# Altium PCB Copy of TQ210_BOARD_V4-20121031.PcbDoc (part 4 of 8)
Units mm, origin at the board's own origin, x right, y up, seen from the top; angles counter-clockwise.
Board outline 191.2 x 131.27 mm, 2 copper layers (TopLayer, BottomLayer); 362 components, 455 nets, 1594 pads, 630 vias.
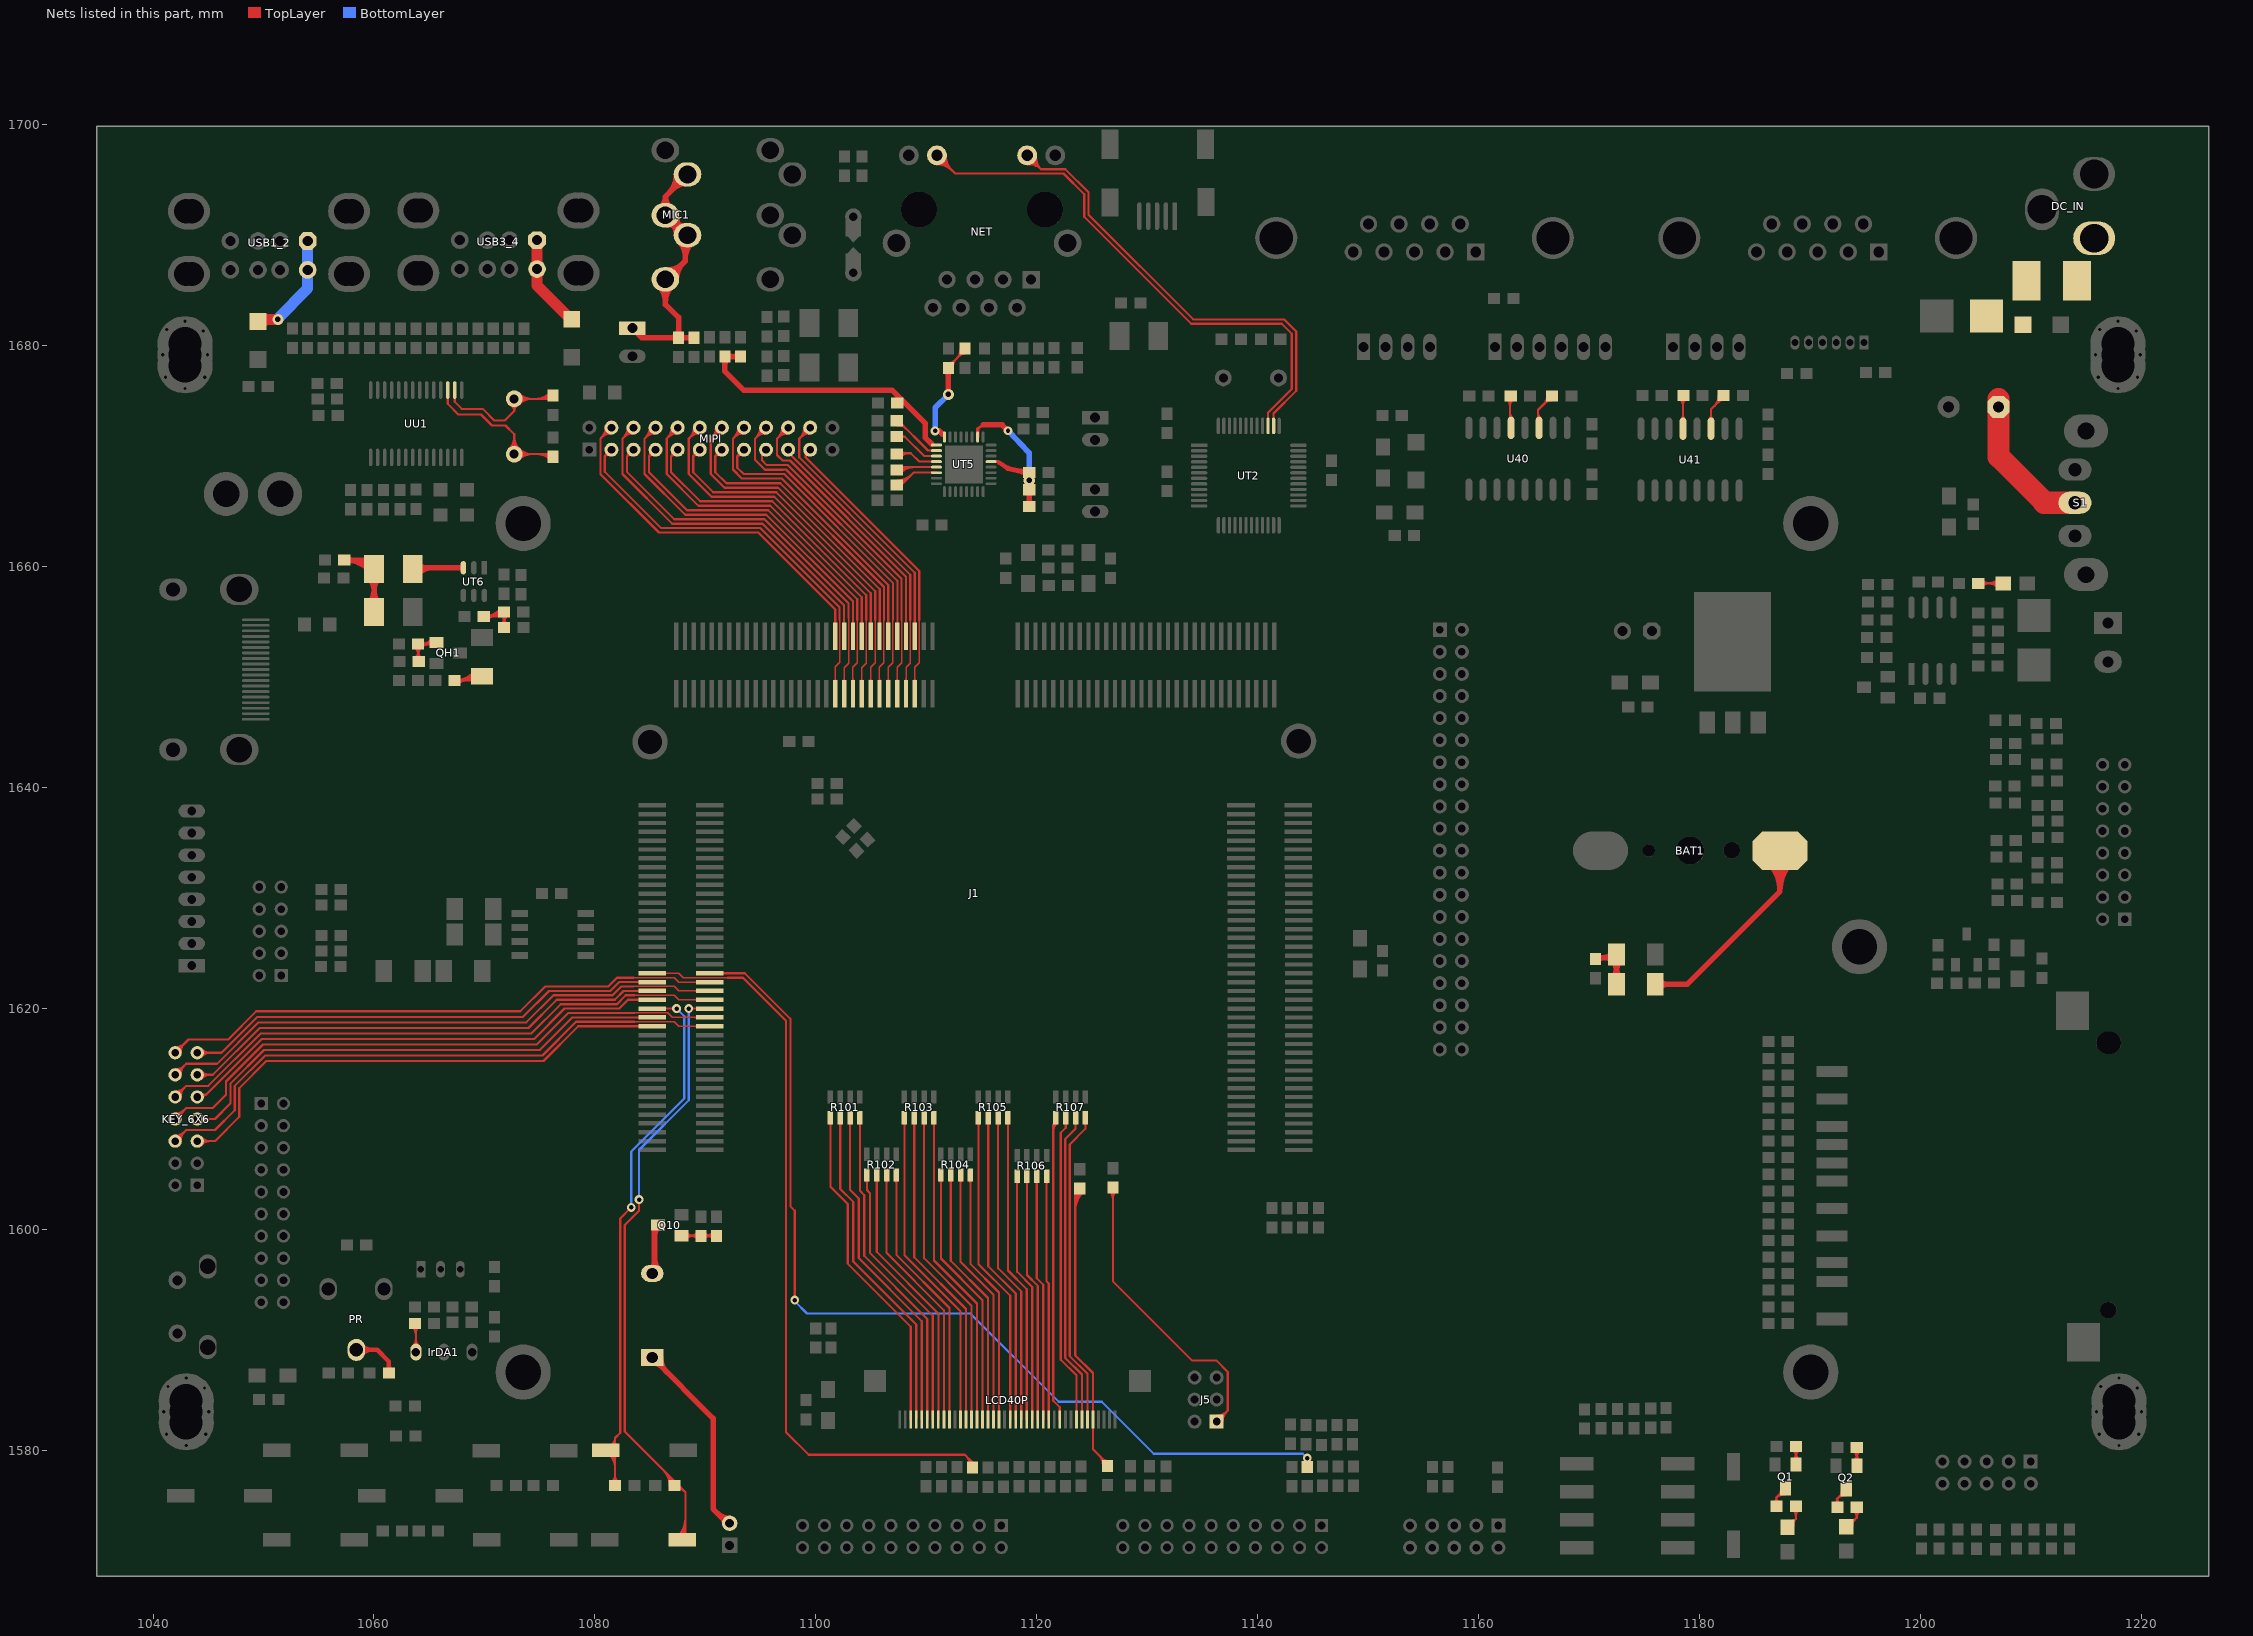
[diagram p4: the nets of this part, all layers, seen from the top]

## Via types
v1: diameter 1, hole 0.5, TopLayer to BottomLayer, 458 vias
v2: diameter 0.8, hole 0.4, TopLayer to BottomLayer, 172 vias

## Nets (pads, with @x,y where several pads share a name; then routed paths per layer and width w, separated by ;. In a path a pad name is that pad's centre, name@x,y a point inside that pad or via, vN(x,y) a via of type N, cw(c..) or ccw(c..) an arc to the next point about the centre after c; other vN are vias at no path point) (continued)
KP_COL2: J1.29 KEY_6X6.5 | length 50.1
  TopLayer w0.2: KEY_6X6.5@1044,1608 1045.6,1608 1047.8,1610.2 1047.8,1612.8 1050.25,1615.25 1075.35,1615.25 1078.5,1618.4 J1.29@1085.2,1618.4 ; KEY_6X6.5@1044.212,1607.788 cw(c1044.724,1607.276) 1044.724,1608 cw(c1044.724,1608.724) KEY_6X6.5@1044.212,1608.212 ; KEY_6X6.5@1044.354,1607.646 cw(c1045.207,1606.793) 1045.207,1608 cw(c1045.207,1609.207) KEY_6X6.5@1044.354,1608.354
KP_COL3: J1.30 KEY_6X6.6 | length 57.9
  TopLayer w0.135: 1083.6,1618.8 1087.2,1618.8 1087.6,1618.4 J1.30@1090.4,1618.4 ; J1.30@1089.256,1618.306 ccw(c1089.03,1618.08) 1089.03,1618.4 ccw(c1089.03,1618.72) J1.30@1089.256,1618.494
  TopLayer w0.2: KEY_6X6.6@1042,1608 1043,1609 1045.6,1609 1047.4,1610.8 1047.4,1613 1050.15,1615.75 1075.25,1615.75 1078.3,1618.8 1083.6,1618.8 ; KEY_6X6.6@1042,1608.3 ccw(c1042,1609.024) 1042.512,1608.512 ccw(c1043.024,1608) KEY_6X6.6@1042.3,1608 ; KEY_6X6.6@1042,1608.5 ccw(c1042,1609.707) 1042.854,1608.854 ccw(c1043.707,1608) KEY_6X6.6@1042.5,1608
KP_COL4: J1.31 KEY_6X6.7 | length 49.1
  TopLayer w0.2: KEY_6X6.7@1044,1610 1045.6,1610 1047,1611.4 1047,1613.2 1050.05,1616.25 1075,1616.25 1077.95,1619.2 J1.31@1085.2,1619.2 ; KEY_6X6.7@1044.212,1609.788 cw(c1044.724,1609.276) 1044.724,1610 cw(c1044.724,1610.724) KEY_6X6.7@1044.212,1610.212 ; KEY_6X6.7@1044.354,1609.646 cw(c1045.207,1608.793) 1045.207,1610 cw(c1045.207,1611.207) KEY_6X6.7@1044.354,1610.354
KP_COL5: J1.32 KEY_6X6.8 | length 56.8
  TopLayer w0.135: 1083.6,1619.6 1086.6,1619.6 1087,1619.2 J1.32@1090.4,1619.2 ; J1.32@1089.256,1619.106 ccw(c1089.03,1618.88) 1089.03,1619.2 ccw(c1089.03,1619.52) J1.32@1089.256,1619.294
  TopLayer w0.2: KEY_6X6.8@1042,1610 1043,1611 1045.4,1611 1046.6,1612.2 1046.6,1613.4 1049.95,1616.75 1074.75,1616.75 1077.6,1619.6 1083.6,1619.6 ; KEY_6X6.8@1042,1610.3 ccw(c1042,1611.024) 1042.512,1610.512 ccw(c1043.024,1610) KEY_6X6.8@1042.3,1610 ; KEY_6X6.8@1042,1610.5 ccw(c1042,1611.707) 1042.854,1610.854 ccw(c1043.707,1610) KEY_6X6.8@1042.5,1610
KP_COL6: J1.33 KEY7.1 R7.1 | length 55.3
  TopLayer w0.2: KEY7.1@1081.296,1579.646 cw(c1080.023,1578.373) 1081.824,1578.373 ; KEY7.1@1081.414,1580.441 ccw(c1081.05,1581.124) 1081.824,1581.124 ; KEY7.1@1081.438,1579.788 cw(c1080.506,1578.856) 1081.824,1578.856 ; KEY7.1@1081.509,1580.265 ccw(c1081.228,1580.79) 1081.824,1580.79 ; R7.1@1081.541,1577.107 ccw(c1080.858,1577.79) 1081.824,1577.79 ccw(c1082.79,1577.79) R7.1@1082.107,1577.107 ; KEY7.1@1081.579,1579.929 cw(c1080.988,1579.338) 1081.824,1579.338 ; R7.1@1081.824,1576.824 1081.824,1581.124 ; 1081.824,1579.213 cw(c1082.437,1579.213) KEY7.1@1082.004,1579.646 ; 1081.824,1580.787 ccw(c1082.437,1580.787) KEY7.1@1082.004,1580.354 ; v2(1083.3,1602) 1082.3,1601 1082.3,1581.6 1081.824,1581.124 ; J1.33@1085.21,1619.99 v2(1087.4,1620)
  BottomLayer w0.2: v2(1083.3,1602) 1083.3,1607.066 1088.1,1611.866 1088.1,1619.3 v2(1087.4,1620)
KP_COL7: J1.34 KEY8.1 R8.1 | length 63.4
  TopLayer w0.2: v2(1084,1602.7) 1084,1601.7 1082.7,1600.4 1082.7,1581.7 1088.2,1576.2 KEY8.1@1088.2,1571.9 ; 1086.207,1578.193 cw(c1084.838,1576.824) R8.1@1086.774,1576.824 ; 1086.548,1577.852 cw(c1085.521,1576.824) R8.1@1086.974,1576.824 ; 1086.89,1577.51 cw(c1086.204,1576.824) R8.1@1087.174,1576.824 ; R8.1@1087.274,1576.824 cw(c1087.328,1576.233) R8.1@1087.747,1576.653 ; R8.1@1087.292,1576.625 cw(c1087.378,1575.68) 1088.049,1576.351 ; KEY8.1@1087.546,1572.254 ccw(c1085.969,1573.831) 1088.2,1573.831 ; KEY8.1@1087.688,1572.112 ccw(c1086.451,1573.349) 1088.2,1573.349 ; KEY8.1@1087.829,1571.971 ccw(c1086.934,1572.866) 1088.2,1572.866 ; v2(1088.5,1620) J1.34@1090.41,1619.99
  BottomLayer w0.2: v2@1084,1602.9 1084,1607.2 1088.5,1611.7 v2(1088.5,1620)
KP_ROW0: J1.35 KEY_6X6.9 | length 46.3
  TopLayer w0.2: KEY_6X6.9@1043.8,1612 KEY_6X6.9@1044,1612 1044.2,1612.2 1044.8,1612.2 ; KEY_6X6.9@1044.297,1611.96 cw(c1044.571,1611.923) 1044.571,1612.2 ; KEY_6X6.9@1044.354,1612.354 ccw(c1044.724,1612.724) 1044.724,1612.2 ; KEY_6X6.9@1044.496,1611.934 cw(c1044.8,1611.893) 1044.8,1612.2 ; J1.35@1085.2,1620.8 1083.004,1620.8 1082.204,1620 1077.25,1620 1074.5,1617.25 1049.85,1617.25 1044.8,1612.2
KP_ROW1: J1.36 KEY_6X6.10 | length 55.9
  TopLayer w0.135: 1083.6,1621.2 1087.2,1621.2 1087.6,1620.8 J1.36@1090.4,1620.8 ; J1.36@1089.256,1620.706 ccw(c1089.03,1620.48) 1089.03,1620.8 ccw(c1089.03,1621.12) J1.36@1089.256,1620.894
  TopLayer w0.2: KEY_6X6.10@1042,1612 1043,1613 1045,1613 1049.75,1617.75 1074.25,1617.75 1076.9,1620.4 1082,1620.4 1082.8,1621.2 1083.6,1621.2 ; KEY_6X6.10@1042,1612.3 ccw(c1042,1613.024) 1042.512,1612.512 ccw(c1043.024,1612) KEY_6X6.10@1042.3,1612 ; KEY_6X6.10@1042,1612.5 ccw(c1042,1613.707) 1042.854,1612.854 ccw(c1043.707,1612) KEY_6X6.10@1042.5,1612
KP_ROW2: J1.37 KEY_6X6.11 | length 47.4
  TopLayer w0.2: KEY_6X6.11@1044,1614 1045.4,1614 1049.65,1618.25 1074,1618.25 1076.55,1620.8 1081.8,1620.8 1082.6,1621.6 J1.37@1085.2,1621.6 ; KEY_6X6.11@1044.212,1613.788 cw(c1044.724,1613.276) 1044.724,1614 cw(c1044.724,1614.724) KEY_6X6.11@1044.212,1614.212 ; KEY_6X6.11@1044.354,1613.646 cw(c1045.207,1612.793) 1045.207,1614 cw(c1045.207,1615.207) KEY_6X6.11@1044.354,1614.354
KP_ROW3: J1.38 KEY_6X6.12 | length 55.4
  TopLayer w0.135: 1083.5,1622 1087.2,1622 1087.6,1621.6 J1.38@1090.4,1621.6 ; J1.38@1089.256,1621.506 ccw(c1089.03,1621.28) 1089.03,1621.6 ccw(c1089.03,1621.92) J1.38@1089.256,1621.694
  TopLayer w0.2: KEY_6X6.12@1042,1614 1043,1615 1045.8,1615 1049.55,1618.75 1073.8,1618.75 1076.25,1621.2 1081.6,1621.2 1082.4,1622 1083.5,1622 ; KEY_6X6.12@1042,1614.3 ccw(c1042,1615.024) 1042.512,1614.512 ccw(c1043.024,1614) KEY_6X6.12@1042.3,1614 ; KEY_6X6.12@1042,1614.5 ccw(c1042,1615.707) 1042.854,1614.854 ccw(c1043.707,1614) KEY_6X6.12@1042.5,1614
KP_ROW4: J1.39 KEY_6X6.13 | length 46.9
  TopLayer w0.2: KEY_6X6.13@1044,1616 1046.2,1616 1049.45,1619.25 1073.5,1619.25 1075.85,1621.6 1081.4,1621.6 1082.2,1622.4 J1.39@1085.2,1622.4 ; KEY_6X6.13@1044.212,1615.788 cw(c1044.724,1615.276) 1044.724,1616 cw(c1044.724,1616.724) KEY_6X6.13@1044.212,1616.212 ; KEY_6X6.13@1044.354,1615.646 cw(c1045.207,1614.793) 1045.207,1616 cw(c1045.207,1617.207) KEY_6X6.13@1044.354,1616.354
KP_ROW5: J1.40 KEY_6X6.14 | length 54.4
  TopLayer w0.135: 1083.5,1622.8 1087.2,1622.8 1087.6,1622.4 J1.40@1090.4,1622.4
  TopLayer w0.2: KEY_6X6.14@1042,1616 1043.2,1617.2 1046.8,1617.2 1049.35,1619.75 1073.25,1619.75 1075.5,1622 1081.2,1622 1082,1622.8 1083.5,1622.8 ; KEY_6X6.14@1042,1616.3 ccw(c1042,1617.024) 1042.512,1616.512 ccw(c1043.024,1616) KEY_6X6.14@1042.3,1616 ; KEY_6X6.14@1042,1616.5 ccw(c1042,1617.707) 1042.854,1616.854 ccw(c1043.707,1616) KEY_6X6.14@1042.5,1616
KP_ROW6: J1.41 RM22.1 | length 71.4
  TopLayer w0.135: J1.41@1085.2,1623.2 1087.6,1623.2 1088,1622.8 1092,1622.8
  TopLayer w0.2: 1092,1622.8 1093.406,1622.8 1097.3,1618.906 1097.3,1581.654 1099.354,1579.6 1113.5,1579.6 1114.2,1578.9 RM22.1@1114.2,1578.448 ; 1113.621,1579.479 cw(c1112.704,1578.561) RM22.1@1114,1578.507 ; 1113.943,1579.157 cw(c1113.322,1578.535) RM22.1@1114.2,1578.498
KP_ROW7: J1.42 RMB22.1 | length 87
  TopLayer w0.2: J1.42@1090.41,1623.19 1090.421,1623.2 1093.572,1623.2 1097.7,1619.072 1097.7,1602.1 1098.1,1601.7 v2(1098.1,1593.6)
  BottomLayer w0.2: v2(1098.1,1593.6) 1098.1,1593.5 1099.2,1592.4 1114,1592.4 1122,1584.4 1125.9,1584.4 1130.6,1579.7 1144.1,1579.7 v2(1144.5,1579.3)
LAN2_LNK: NET.10 UT2.38 | length 46.2
  TopLayer w0.2: NET.10@1119.14,1697.25 1120.39,1696 ; NET.10@1119.179,1696.651 cw(c1119.254,1695.489) 1120.077,1696.313 cw(c1120.901,1697.136) NET.10@1119.739,1697.211 ; NET.10@1119.192,1696.452 cw(c1119.292,1694.902) 1120.39,1696 ; NET.10@1119.938,1697.198 ccw(c1121.488,1697.098) 1120.39,1696 ; UT2.38@1141.453,1672.754 1141.453,1673.888 1143.5,1675.934 1143.5,1681.3 1142.4,1682.4 1134.166,1682.4 1124.7,1691.866 1124.7,1693.9 1122.6,1696 1120.39,1696
LAN2_SPD: NET.11 UT2.39 | length 56.1
  TopLayer w0.2: NET.11@1110.97,1696.45 cw(c1110.97,1694.519) 1112.336,1695.884 cw(c1113.701,1697.25) NET.11@1111.77,1697.25 ; NET.11@1110.97,1696.65 cw(c1110.97,1695.201) 1111.994,1696.226 cw(c1113.019,1697.25) NET.11@1111.57,1697.25 ; NET.11@1110.97,1696.85 cw(c1110.97,1695.884) 1111.653,1696.567 cw(c1112.336,1697.25) NET.11@1111.37,1697.25 ; NET.11@1110.97,1697.25 1112.62,1695.6 1122.434,1695.6 1124.3,1693.734 1124.3,1691.7 1134,1682 1142.2,1682 1143.1,1681.1 1143.1,1676.1 1140.953,1673.953 UT2.39@1140.953,1672.754
LHSYNC: LCD40P.35 R107.8 | length 29.2
  TopLayer w0.2: R107.8@1124.305,1609.67 cw(c1124.049,1609.414) 1124.411,1609.414 cw(c1124.773,1609.414) R107.8@1124.517,1609.67 ; R107.8@1124.411,1610.126 1124.411,1609.111 1122.998,1607.698 1122.998,1588.534 1124.6,1586.931 LCD40P.35@1124.6,1582.7
LVCLK: CL5.1 LCD40P.36 R108.1 | length 34.2
  TopLayer w0.2: 1123.498,1601.713 cw(c1125.837,1601.713) R108.1@1124.183,1603.367 ; 1123.498,1602.196 cw(c1125.354,1602.196) R108.1@1124.041,1603.509 ; 1123.498,1602.679 cw(c1124.871,1602.679) R108.1@1123.9,1603.65 ; R108.1@1123.498,1603.162 cw(c1124.388,1603.162) R108.1@1123.759,1603.791 ; R108.1@1124.1,1604 1123.498,1603.398 1123.498,1588.599 1125.1,1586.997 LCD40P.36@1125.1,1582.8 1125.1,1580.1 CL5.1@1126.6,1578.6 ; 1125.611,1579.589 cw(c1124.672,1578.65) CL5.1@1126,1578.65 ; 1125.953,1579.247 cw(c1125.355,1578.65) CL5.1@1126.2,1578.65 ; 1125.973,1579.227 ccw(c1126.4,1579.654) CL5.1@1126.4,1579.05
LVD0: LCD40P.3 R101.5 | length 30.9
  TopLayer w0.2: R101.5@1101.227,1609.67 cw(c1100.971,1609.414) 1101.333,1609.414 cw(c1101.695,1609.414) R101.5@1101.439,1609.67 ; R101.5@1101.333,1610.126 1101.333,1603.857 1102.89,1602.3 1102.89,1596.91 1108.6,1591.2 LCD40P.3@1108.6,1582.8
LVD1: LCD40P.4 R101.6 | length 30.6
  TopLayer w0.2: R101.6@1102.116,1609.67 cw(c1101.86,1609.414) 1102.222,1609.414 cw(c1102.584,1609.414) R101.6@1102.328,1609.67 ; R101.6@1102.222,1610.126 1102.222,1603.668 1103.39,1602.5 1103.39,1597.11 1109.1,1591.4 LCD40P.4@1109.1,1582.9
LVD2: LCD40P.5 R101.7 | length 30.7
  TopLayer w0.2: R101.7@1103.005,1609.67 cw(c1102.775,1609.44) 1103.1,1609.44 ; 1103.1,1609.387 cw(c1103.5,1609.387) R101.7@1103.217,1609.67 ; R101.7@1103.1,1610.2 1103.1,1603.59 1103.89,1602.8 1103.89,1597.41 1109.6,1591.7 LCD40P.5@1109.6,1582.8
LVD3: LCD40P.6 R101.8 | length 30.4
  TopLayer w0.2: R101.8@1103.894,1609.67 cw(c1103.638,1609.414) 1104,1609.414 cw(c1104.362,1609.414) R101.8@1104.106,1609.67 ; R101.8@1104,1610.126 1104,1603.5 1104.39,1603.11 1104.39,1597.61 1110.1,1591.9 LCD40P.6@1110.1,1582.8
LVD4: LCD40P.7 R102.5 | length 25.2
  TopLayer w0.2: R102.5@1104.527,1604.47 cw(c1104.271,1604.214) 1104.633,1604.214 cw(c1104.995,1604.214) R102.5@1104.739,1604.47 ; R102.5@1104.633,1604.926 1104.633,1603.567 1104.9,1603.3 1104.9,1597.9 1110.6,1592.2 LCD40P.7@1110.6,1582.8
LVD5: LCD40P.8 R102.6 | length 25
  TopLayer w0.2: R102.6@1105.416,1604.47 cw(c1105.16,1604.214) 1105.522,1604.214 cw(c1105.884,1604.214) R102.6@1105.628,1604.47 ; R102.6@1105.522,1604.926 1105.522,1597.978 1111.1,1592.4 LCD40P.8@1111.1,1582.8
LVD6: LCD40P.9 R102.7 | length 24.9
  TopLayer w0.2: R102.7@1106.305,1604.47 cw(c1106.049,1604.214) 1106.411,1604.214 cw(c1106.773,1604.214) R102.7@1106.517,1604.47 ; R102.7@1106.411,1604.926 1106.411,1597.889 1111.6,1592.7 LCD40P.9@1111.6,1582.7
LVD7: LCD40P.10 R102.8 | length 24.7
  TopLayer w0.2: R102.8@1107.194,1604.47 cw(c1106.938,1604.214) 1107.3,1604.214 cw(c1107.662,1604.214) R102.8@1107.406,1604.47 ; R102.8@1107.3,1604.926 1107.3,1597.7 1112.1,1592.9 LCD40P.10@1112.1,1582.8
LVD8: LCD40P.12 R103.5 | length 30.1
  TopLayer w0.2: R103.5@1107.927,1609.67 cw(c1107.671,1609.414) 1108.033,1609.414 cw(c1108.395,1609.414) R103.5@1108.139,1609.67 ; R103.5@1108.033,1610.126 1108.033,1597.667 1113.1,1592.6 LCD40P.12@1113.1,1582.7
LVD9: LCD40P.13 R103.6 | length 29.8
  TopLayer w0.2: R103.6@1108.816,1609.67 cw(c1108.56,1609.414) 1108.922,1609.414 cw(c1109.284,1609.414) R103.6@1109.028,1609.67 ; R103.6@1108.922,1610.126 1108.922,1597.478 1113.6,1592.8 LCD40P.13@1113.6,1582.8
LVD10: LCD40P.14 R103.7 | length 29.7
  TopLayer w0.2: R103.7@1109.705,1609.67 cw(c1109.449,1609.414) 1109.811,1609.414 cw(c1110.173,1609.414) R103.7@1109.917,1609.67 ; R103.7@1109.811,1610.126 1109.811,1597.389 1114.1,1593.1 LCD40P.14@1114.1,1582.8
LVD11: LCD40P.15 R103.8 | length 29.5
  TopLayer w0.2: R103.8@1110.594,1609.67 cw(c1110.338,1609.414) 1110.7,1609.414 cw(c1111.062,1609.414) R103.8@1110.806,1609.67 ; R103.8@1110.7,1610.126 1110.7,1597.2 1114.6,1593.3 LCD40P.15@1114.6,1582.8
LVD12: LCD40P.16 R104.5 | length 24.3
  TopLayer w0.2: R104.5@1111.227,1604.47 cw(c1110.971,1604.214) 1111.333,1604.214 cw(c1111.695,1604.214) R104.5@1111.439,1604.47 ; R104.5@1111.333,1604.926 1111.333,1597.367 1115.1,1593.6 LCD40P.16@1115.1,1582.8
LVD13: LCD40P.17 R104.6 | length 24
  TopLayer w0.2: R104.6@1112.116,1604.47 cw(c1111.86,1604.214) 1112.222,1604.214 cw(c1112.584,1604.214) R104.6@1112.328,1604.47 ; R104.6@1112.222,1604.926 1112.222,1597.178 1115.6,1593.8 LCD40P.17@1115.6,1582.9
LVD14: LCD40P.18 R104.7 | length 23.8
  TopLayer w0.2: R104.7@1113.005,1604.47 cw(c1112.749,1604.214) 1113.111,1604.214 cw(c1113.473,1604.214) R104.7@1113.217,1604.47 ; R104.7@1113.111,1604.926 1113.111,1597.089 1116.1,1594.1 LCD40P.18@1116.1,1582.9
LVD15: LCD40P.19 R104.8 | length 23.8
  TopLayer w0.2: R104.8@1113.894,1604.47 cw(c1113.638,1604.214) 1114,1604.214 cw(c1114.362,1604.214) R104.8@1114.106,1604.47 ; R104.8@1114,1604.926 1114,1596.9 1116.6,1594.3 LCD40P.19@1116.6,1582.8
LVD16: LCD40P.21 R105.5 | length 29.1
  TopLayer w0.2: R105.5@1114.627,1609.67 cw(c1114.371,1609.414) 1114.733,1609.414 cw(c1115.095,1609.414) R105.5@1114.839,1609.67 ; R105.5@1114.733,1610.126 1114.733,1596.862 1117.6,1593.995 LCD40P.21@1117.6,1582.8
LVD17: LCD40P.22 R105.6 | length 28.9
  TopLayer w0.2: R105.6@1115.516,1609.67 cw(c1115.26,1609.414) 1115.622,1609.414 cw(c1115.984,1609.414) R105.6@1115.728,1609.67 ; R105.6@1115.622,1610.126 1115.622,1596.673 1118.1,1594.195 LCD40P.22@1118.1,1582.8
LVD18: LCD40P.23 R105.7 | length 28.8
  TopLayer w0.2: R105.7@1116.405,1609.67 cw(c1116.149,1609.414) 1116.511,1609.414 cw(c1116.873,1609.414) R105.7@1116.617,1609.67 ; R105.7@1116.511,1610.126 1116.511,1596.484 1118.6,1594.395 LCD40P.23@1118.6,1582.8
LVD19: LCD40P.24 R105.8 | length 28.6
  TopLayer w0.2: R105.8@1117.294,1609.67 cw(c1117.038,1609.414) 1117.4,1609.414 cw(c1117.762,1609.414) R105.8@1117.506,1609.67 ; R105.8@1117.4,1610.126 1117.4,1596.295 1119.1,1594.595 LCD40P.24@1119.1,1582.8
LVD20: LCD40P.25 R106.5 | length 23.2
  TopLayer w0.2: R106.5@1118.127,1604.37 cw(c1117.871,1604.114) 1118.233,1604.114 cw(c1118.595,1604.114) R106.5@1118.339,1604.37 ; R106.5@1118.233,1604.826 1118.233,1596.162 1119.6,1594.795 LCD40P.25@1119.6,1582.8
LVD21: LCD40P.26 R106.6 | length 23
  TopLayer w0.2: R106.6@1119.016,1604.37 cw(c1118.76,1604.114) 1119.122,1604.114 cw(c1119.484,1604.114) R106.6@1119.228,1604.37 ; R106.6@1119.122,1604.826 1119.122,1595.873 1120.1,1594.895 LCD40P.26@1120.1,1582.8
LVD22: LCD40P.27 R106.7 | length 22.8
  TopLayer w0.2: R106.7@1119.905,1604.37 cw(c1119.649,1604.114) 1120.011,1604.114 cw(c1120.373,1604.114) R106.7@1120.117,1604.37 ; R106.7@1120.011,1604.826 1120.011,1595.589 1120.6,1595 LCD40P.27@1120.6,1582.8
LVD23: LCD40P.28 R106.8 | length 22.7
  TopLayer w0.2: R106.8@1120.794,1604.37 cw(c1120.538,1604.114) 1120.9,1604.114 cw(c1121.262,1604.114) R106.8@1121.006,1604.37 ; R106.8@1120.9,1604.826 1120.9,1595.3 1121.1,1595.1 LCD40P.28@1121.1,1582.8
LVDEN: LCD40P.33 R107.6 | length 28.8
  TopLayer w0.2: R107.6@1122.527,1609.67 cw(c1122.271,1609.414) 1122.633,1609.414 cw(c1122.995,1609.414) R107.6@1122.739,1609.67 ; R107.6@1122.633,1610.126 1122.633,1609.2 1122.19,1608.757 1122.19,1588.21 1123.6,1586.8 LCD40P.33@1123.6,1582.7
LVSYNC: LCD40P.34 R107.7 | length 28.9
  TopLayer w0.2: R107.7@1123.416,1609.67 cw(c1123.16,1609.414) 1123.522,1609.414 cw(c1123.884,1609.414) R107.7@1123.628,1609.67 ; R107.7@1123.522,1610.126 1123.522,1609.122 1122.598,1608.198 1122.598,1588.368 1124.1,1586.866 LCD40P.34@1124.1,1582.8
LXPWMTOUT0: LCD40P.30 R107.5 | length 29.7
  TopLayer w0.2: 1121.5,1608.825 cw(c1122.695,1608.825) R107.5@1121.85,1609.67 ; 1121.5,1609.308 cw(c1122.212,1609.308) R107.5@1121.709,1609.811 ; 1121.516,1609.516 ccw(c1121.317,1609.715) R107.5@1121.596,1609.755 ; R107.5@1121.543,1609.543 cw(c1121.744,1609.341) R107.5@1121.744,1609.626 ; R107.5@1121.744,1610.126 1121.744,1609.744 1121.5,1609.5 1121.5,1584.5 1122.1,1583.9 LCD40P.30@1122.1,1582.8
LXPWMTOUT3: J5.1 R109.1 | length 35.3
  TopLayer w0.2: R109.1@1126.617,1603.467 cw(c1125.934,1602.784) 1126.9,1602.784 cw(c1127.866,1602.784) R109.1@1127.183,1603.467 ; R109.1@1126.9,1603.8 1126.9,1595.3 1134.052,1588.148 1136.252,1588.148 1137.3,1587.1 1137.3,1583.6 J5.1@1136.3,1582.6 ; J5.1@1136.872,1583.172 cw(c1136.3,1583.744) 1136.3,1582.935 ccw(c1136.3,1583.744) J5.1@1136.872,1583.172 ; J5.1@1136.872,1583.172 ccw(c1137.444,1582.6) 1136.635,1582.6 cw(c1137.444,1582.6) J5.1@1136.872,1583.172 ; 1137.213,1583.513 cw(c1136.3,1584.427) 1136.3,1583.135 ccw(c1136.3,1584.427) 1137.213,1583.513 ; 1137.213,1583.513 ccw(c1138.127,1582.6) 1136.835,1582.6 cw(c1138.127,1582.6) 1137.213,1583.513
MIC: C524.1 UT5.4 | length 6
  TopLayer w0.2: C524.1@1107.329,1670.278 1108.603,1670.278 1109.357,1669.524 UT5.4@1110.928,1669.524 ; C524.1@1107.519,1670.083 cw(c1107.992,1669.61) 1107.992,1670.278 ; C524.1@1107.661,1669.941 cw(c1108.475,1669.127) 1108.475,1670.278 ; C524.1@1107.661,1670.507 ccw(c1108.212,1671.058) 1108.212,1670.278
MIC1_P1: C525.1 MIC1.2 MIC1.3 MIC1.10 MIC1.11 MIC2.1 R505.1 | length 51.5
  TopLayer w0.5: MIC2.1@1083.4,1681.6 1084.264,1680.736 1088.979,1680.736 R505.1@1088.981,1680.733 ; MIC1.10@1085.784,1685.424 cw(c1084.333,1683.973) 1086.385,1683.973 cw(c1088.437,1683.973) MIC1.10@1086.986,1685.424 ; MIC1.11@1085.875,1692.505 ccw(c1085.11,1693.525) 1086.385,1693.525 ; MIC1.10@1086.285,1685.775 1088.185,1687.675 MIC1.3@1088.185,1690.025 ; 1086.385,1683.707 MIC1.10@1086.385,1686.025 ; 1086.385,1683.766 1087.574,1682.577 C525.1@1087.574,1680.736 ; MIC1.10@1086.535,1686.875 ccw(c1086.535,1688.927) 1087.986,1687.476 ccw(c1089.437,1686.025) MIC1.10@1087.385,1686.025 ; MIC1.11@1086.535,1690.975 cw(c1086.535,1689.285) MIC1.3@1087.73,1690.48 ; 1086.678,1693.818 ccw(c1084.971,1695.525) MIC1.2@1087.385,1695.525 ; MIC1.11@1086.699,1691.511 ccw(c1088.235,1693.047) MIC1.3@1088.235,1690.875 ; MIC1.11@1086.82,1691.39 cw(c1085.454,1690.025) MIC1.3@1087.385,1690.025 ; MIC1.11@1086.885,1691.825 ccw(c1088.092,1691.825) 1087.239,1690.971 ; MIC1.11@1086.895,1692.505 cw(c1087.66,1693.525) 1086.385,1693.525 ; 1087.04,1694.18 cw(c1088.235,1692.985) MIC1.2@1088.235,1694.675 ; MIC1.11@1087.385,1691.825 ccw(c1089.799,1691.825) MIC1.3@1088.092,1690.118 ; C525.1@1087.397,1680.559 ccw(c1086.97,1680.132) 1086.97,1680.736 ccw(c1086.97,1681.339) C525.1@1087.397,1680.912 ; C525.1@1087.397,1680.962 ccw(c1086.97,1681.389) 1087.574,1681.389 ccw(c1088.178,1681.389) C525.1@1087.751,1680.962 ; 1087.532,1694.671 ccw(c1086.678,1695.525) MIC1.2@1087.885,1695.525 ; MIC1.3@1087.634,1689.424 cw(c1086.304,1688.093) 1088.185,1688.093 ; C525.1@1087.751,1680.559 cw(c1088.178,1680.132) 1088.178,1680.736 cw(c1088.178,1681.339) C525.1@1087.751,1680.912 ; 1088.185,1687.852 cw(c1090.408,1687.852) MIC1.3@1088.836,1689.424 ; 1088.372,1680.736 cw(c1088.372,1680.125) R505.1@1088.804,1680.557 ; 1088.383,1680.736 ccw(c1088.383,1681.332) R505.1@1088.804,1680.91 ; MIC1.3@1088.385,1690.025 MIC1.3@1088.185,1690.025 ; MIC1.2@1088.385,1695.525 1086.385,1693.525 ; R505.1@1088.97,1680.83 R505.1@1089,1680.8 ; 1086.385,1693.525 MIC1.11@1086.385,1691.825 MIC1.3@1088.185,1690.025
MICBIAS: C509.1 C511.1 R504.2 UT5.1 | length 29.5
  TopLayer w0.5: C509.1@1091.604,1678.807 cw(c1091.177,1678.38) 1091.781,1678.38 cw(c1092.385,1678.38) C509.1@1091.958,1678.807 ; C509.1@1091.958,1678.857 cw(c1092.385,1678.43) 1092.385,1679.033 cw(c1092.385,1679.637) C509.1@1091.958,1679.21 ; C511.1@1093.004,1678.857 ccw(c1092.577,1678.43) 1092.577,1679.033 ccw(c1092.577,1679.637) C511.1@1093.004,1679.21 ; C511.1@1093.181,1679.033 C509.1@1091.781,1679.033 1091.781,1677.683 1093.464,1676 1106.9,1676 1109.9,1673 1109.9,1671.7 UT5.1@1110.501,1671.099 ; 1107.281,1675.619 cw(c1106.556,1674.894) R504.2@1107.577,1674.801 ; R504.2@1107.428,1675.074 cw(c1107.428,1674.113) 1108.108,1674.792
MIPI_MD_DN0: J1.128 MIPI.13 | length 33.3
  TopLayer w0.135: J1.128@1105.677,1649.649 ccw(c1105.451,1649.876) 1105.771,1649.876 ccw(c1106.09,1649.876) J1.128@1105.864,1649.649 ; J1.128@1105.771,1648.506 1105.771,1650.905 1106.17,1651.305 1106.17,1655.394
  TopLayer w0.2: MIPI.13@1090.996,1670.422 cw(c1090.613,1670.287) 1090.9,1670 ; MIPI.13@1091.322,1670.096 ccw(c1091.187,1669.713) 1090.9,1670 ; MIPI.13@1091.5,1670.6 1090.9,1670 ; 1106.17,1655.191 1106.17,1658.163 1096.778,1667.554 1091.911,1667.554 1090.9,1668.566 1090.9,1670
MIPI_MD_DN1: J1.130 MIPI.15 | length 32.1
  TopLayer w0.135: J1.130@1106.477,1649.649 ccw(c1106.251,1649.876) 1106.571,1649.876 ccw(c1106.89,1649.876) J1.130@1106.664,1649.649 ; J1.130@1106.571,1648.506 1106.571,1650.893 1106.983,1651.305 1106.983,1655.394
  TopLayer w0.2: MIPI.15@1092.996,1670.422 cw(c1092.613,1670.287) 1092.9,1670 ; MIPI.15@1093.322,1670.096 ccw(c1093.187,1669.713) 1092.9,1670 ; MIPI.15@1093.5,1670.6 1092.9,1670 ; 1106.983,1655.216 1106.983,1658.544 1097.134,1668.393 1093.473,1668.393 1092.9,1668.966 1092.9,1670
MIPI_MD_DN2: J1.132 MIPI.17 | length 29.5
  TopLayer w0.135: J1.132@1107.277,1649.649 ccw(c1107.051,1649.876) 1107.371,1649.876 ccw(c1107.69,1649.876) J1.132@1107.464,1649.649 ; J1.132@1107.371,1648.506 1107.371,1650.905 1107.77,1651.305 1107.77,1655.394
  TopLayer w0.2: MIPI.17@1095.5,1670.6 1095.132,1670.232 1095.132,1669.633 1095.56,1669.205 1097.49,1669.205 1107.77,1658.925 1107.77,1655.191
MIPI_MD_DN3: J1.134 MIPI.19 | length 27.2
  TopLayer w0.135: J1.134@1108.077,1649.649 ccw(c1107.851,1649.876) 1108.171,1649.876 ccw(c1108.49,1649.876) J1.134@1108.264,1649.649 ; J1.134@1108.171,1648.506 1108.171,1650.892 1108.558,1651.279 1108.558,1655.394
  TopLayer w0.2: MIPI.19@1097.585,1670.253 1097.592,1670.253 1108.558,1659.287 1108.558,1655.191
MIPI_MD_DP0: J1.127 MIPI.14 | length 31.8
  TopLayer w0.2: MIPI.14@1090.965,1672.6 cw(c1089.673,1672.6) 1090.587,1671.687 cw(c1091.5,1670.773) MIPI.14@1091.5,1672.065 ; MIPI.14@1091.165,1672.6 cw(c1090.356,1672.6) 1090.928,1672.028 cw(c1091.5,1671.456) MIPI.14@1091.5,1672.265 ; MIPI.14@1091.5,1672.6 1090.5,1671.6 1090.5,1668.4 1091.746,1667.154 1096.594,1667.154 1105.789,1657.96 1105.789,1653.724 J1.127@1105.771,1653.706
MIPI_MD_DP1: J1.129 MIPI.16 | length 30.6
  TopLayer w0.2: MIPI.16@1092.965,1672.6 cw(c1091.673,1672.6) 1092.587,1671.687 cw(c1093.5,1670.773) MIPI.16@1093.5,1672.065 ; MIPI.16@1093.165,1672.6 cw(c1092.356,1672.6) 1092.928,1672.028 cw(c1093.5,1671.456) MIPI.16@1093.5,1672.265 ; MIPI.16@1093.5,1672.6 1092.5,1671.6 1092.5,1668.8 1093.307,1667.993 1096.924,1667.993 1106.571,1658.346 J1.129@1106.571,1653.706
MIPI_MD_DP2: J1.131 MIPI.18 | length 30.1
  TopLayer w0.2: MIPI.18@1094.965,1672.6 cw(c1093.673,1672.6) 1094.587,1671.687 cw(c1095.5,1670.773) MIPI.18@1095.5,1672.065 ; MIPI.18@1095.165,1672.6 cw(c1094.356,1672.6) 1094.928,1672.028 cw(c1095.5,1671.456) MIPI.18@1095.5,1672.265 ; MIPI.18@1095.5,1672.6 1094.5,1671.6 1094.5,1669.7 1095.407,1668.793 1097.007,1668.793 ; 1095.985,1668.805 1097.305,1668.805 1107.37,1658.741 ; J1.131@1107.371,1653.706 1107.389,1653.724 1107.389,1658.722
MIPI_MD_DP3: J1.133 MIPI.20 | length 27.8
  TopLayer w0.2: MIPI.20@1096.965,1672.6 cw(c1095.673,1672.6) 1096.587,1671.687 cw(c1097.5,1670.773) MIPI.20@1097.5,1672.065 ; MIPI.20@1097.165,1672.6 cw(c1096.356,1672.6) 1096.928,1672.028 cw(c1097.5,1671.456) MIPI.20@1097.5,1672.265 ; MIPI.20@1097.5,1672.6 1096.5,1671.6 1096.5,1670.118 1097,1669.618 1097.661,1669.618 1108.171,1659.109 J1.133@1108.171,1653.706
MIPI_MD_NCLK: J1.136 MIPI.21 | length 27.4
  TopLayer w0.135: J1.136@1108.877,1649.649 ccw(c1108.651,1649.876) 1108.971,1649.876 ccw(c1109.29,1649.876) J1.136@1109.064,1649.649 ; J1.136@1108.971,1648.506 1108.971,1650.905 1109.37,1651.305 1109.37,1655.394
  TopLayer w0.2: MIPI.21@1099.5,1670.6 1099.094,1670.194 1099.094,1669.894 1109.37,1659.617 1109.37,1655.191
MIPI_MD_PCLK: J1.135 MIPI.22 | length 26.9
  TopLayer w0.2: MIPI.22@1098.965,1672.6 cw(c1097.673,1672.6) 1098.587,1671.687 cw(c1099.5,1670.773) MIPI.22@1099.5,1672.065 ; MIPI.22@1099.165,1672.6 cw(c1098.356,1672.6) 1098.928,1672.028 cw(c1099.5,1671.456) MIPI.22@1099.5,1672.265 ; MIPI.22@1099.5,1672.6 1098.5,1671.6 1098.5,1669.922 1108.971,1659.452 J1.135@1108.971,1653.706
MIPI_SD_DN0: J1.118 MIPI.3 | length 38.2
  TopLayer w0.135: J1.118@1101.671,1649.641 ccw(c1101.445,1649.867) 1101.765,1649.867 ccw(c1102.084,1649.867) J1.118@1101.858,1649.641 ; J1.118@1101.765,1648.497 1101.765,1650.963 1102.157,1651.356 1102.157,1655.394
  TopLayer w0.2: MIPI.3@1080.996,1670.422 cw(c1080.613,1670.287) 1080.9,1670 ; MIPI.3@1081.322,1670.096 ccw(c1081.187,1669.713) 1080.9,1670 ; MIPI.3@1081.5,1670.6 1080.9,1670 ; 1102.157,1655.191 1102.157,1656.334 1094.991,1663.5 1086,1663.5 1080.9,1668.6 1080.9,1670
MIPI_SD_DN1: J1.120 MIPI.5 | length 37
  TopLayer w0.135: J1.120@1102.471,1649.641 ccw(c1102.245,1649.867) 1102.565,1649.867 ccw(c1102.884,1649.867) J1.120@1102.658,1649.641 ; J1.120@1102.565,1648.497 1102.565,1650.865 1102.97,1651.27 1102.97,1655.394
  TopLayer w0.2: MIPI.5@1082.996,1670.422 cw(c1082.613,1670.287) 1082.9,1670 ; MIPI.5@1083.322,1670.096 ccw(c1083.187,1669.713) 1082.9,1670 ; MIPI.5@1083.5,1670.6 1082.9,1670 ; 1102.97,1655.394 1102.97,1656.69 1095.356,1664.303 1087.197,1664.303 1082.9,1668.6 1082.9,1670
MIPI_SD_DN2: J1.122 MIPI.7 | length 36.2
  TopLayer w0.135: J1.122@1103.277,1649.649 ccw(c1103.051,1649.876) 1103.371,1649.876 ccw(c1103.69,1649.876) J1.122@1103.464,1649.649 ; J1.122@1103.371,1648.506 1103.371,1650.918 1103.757,1651.305 1103.757,1655.394
  TopLayer w0.2: MIPI.7@1084.996,1670.422 cw(c1084.613,1670.287) 1084.9,1670 ; MIPI.7@1085.322,1670.096 ccw(c1085.187,1669.713) 1084.9,1670 ; MIPI.7@1085.5,1670.6 1084.9,1670 ; 1103.757,1655.191 1103.757,1657.071 1095.712,1665.116 1088.35,1665.116 1084.9,1668.566 1084.9,1670
MIPI_SD_DN3: J1.124 MIPI.9 | length 35.3
  TopLayer w0.135: J1.124@1104.077,1649.649 ccw(c1103.851,1649.876) 1104.171,1649.876 ccw(c1104.49,1649.876) J1.124@1104.264,1649.649 ; J1.124@1104.171,1648.506 1104.171,1650.88 1104.57,1651.279 1104.57,1655.394
  TopLayer w0.2: MIPI.9@1086.996,1670.422 cw(c1086.613,1670.287) 1086.9,1670 ; MIPI.9@1087.322,1670.096 ccw(c1087.187,1669.713) 1086.9,1670 ; MIPI.9@1087.5,1670.6 1086.9,1670 ; 1104.57,1655.191 1104.57,1657.426 1096.067,1665.929 1089.537,1665.929 1086.9,1668.566 1086.9,1670
MIPI_SD_DP0: J1.117 MIPI.4 | length 36.7
  TopLayer w0.2: MIPI.4@1080.965,1672.6 cw(c1079.673,1672.6) 1080.587,1671.687 cw(c1081.5,1670.773) MIPI.4@1081.5,1672.065 ; MIPI.4@1081.165,1672.6 cw(c1080.356,1672.6) 1080.928,1672.028 cw(c1081.5,1671.456) MIPI.4@1081.5,1672.265 ; MIPI.4@1081.5,1672.6 1080.5,1671.6 1080.5,1668.4 1085.8,1663.1 1094.8,1663.1 1101.765,1656.135 J1.117@1101.765,1653.697
MIPI_SD_DP1: J1.119 MIPI.6 | length 35.7
  TopLayer w0.2: MIPI.6@1082.965,1672.6 cw(c1081.673,1672.6) 1082.587,1671.687 cw(c1083.5,1670.773) MIPI.6@1083.5,1672.065 ; MIPI.6@1083.165,1672.6 cw(c1082.356,1672.6) 1082.928,1672.028 cw(c1083.5,1671.456) MIPI.6@1083.5,1672.265 ; MIPI.6@1083.5,1672.6 1082.5,1671.6 1082.5,1668.4 1086.997,1663.903 1095.172,1663.903 1102.565,1656.51 J1.119@1102.565,1653.697
MIPI_SD_DP2: J1.121 MIPI.8 | length 34.7
  TopLayer w0.2: MIPI.8@1084.965,1672.6 cw(c1083.673,1672.6) 1084.587,1671.687 cw(c1085.5,1670.773) MIPI.8@1085.5,1672.065 ; MIPI.8@1085.165,1672.6 cw(c1084.356,1672.6) 1084.928,1672.028 cw(c1085.5,1671.456) MIPI.8@1085.5,1672.265 ; MIPI.8@1085.5,1672.6 1084.5,1671.6 1084.5,1668.4 1088.184,1664.716 1095.527,1664.716 1103.371,1656.873 J1.121@1103.371,1653.706
MIPI_SD_DP3: J1.123 MIPI.10 | length 33.7
  TopLayer w0.2: MIPI.10@1086.965,1672.6 cw(c1085.673,1672.6) 1086.587,1671.687 cw(c1087.5,1670.773) MIPI.10@1087.5,1672.065 ; MIPI.10@1087.165,1672.6 cw(c1086.356,1672.6) 1086.928,1672.028 cw(c1087.5,1671.456) MIPI.10@1087.5,1672.265 ; MIPI.10@1087.5,1672.6 1086.5,1671.6 1086.5,1668.4 1089.371,1665.529 1095.883,1665.529 1104.171,1657.241 J1.123@1104.171,1653.706
MIPI_SD_NCLK: J1.126 MIPI.11 | length 34.3
  TopLayer w0.135: J1.126@1104.877,1649.649 ccw(c1104.651,1649.876) 1104.971,1649.876 ccw(c1105.29,1649.876) J1.126@1105.064,1649.649 ; J1.126@1104.971,1648.506 1104.971,1650.893 1105.383,1651.305 1105.383,1655.394
  TopLayer w0.2: MIPI.11@1088.996,1670.422 cw(c1088.613,1670.287) 1088.9,1670 ; MIPI.11@1089.322,1670.096 ccw(c1089.187,1669.713) 1088.9,1670 ; MIPI.11@1089.5,1670.6 1088.9,1670 ; 1105.383,1655.191 1105.383,1657.782 1096.423,1666.742 1090.724,1666.742 1088.9,1668.566 1088.9,1670
MIPI_SD_PCLK: J1.125 MIPI.12 | length 32.8
  TopLayer w0.2: MIPI.12@1088.965,1672.6 cw(c1087.673,1672.6) 1088.587,1671.687 cw(c1089.5,1670.773) MIPI.12@1089.5,1672.065 ; MIPI.12@1089.165,1672.6 cw(c1088.356,1672.6) 1088.928,1672.028 cw(c1089.5,1671.456) MIPI.12@1089.5,1672.265 ; MIPI.12@1089.5,1672.6 1088.5,1671.6 1088.5,1668.4 1090.558,1666.342 1096.239,1666.342 1104.971,1657.61 J1.125@1104.971,1653.706
NetBAT1_1: BAT1.1 D4.1 | length 29.9
  TopLayer w0.5: D4.1@1176,1622.2 1178.9,1622.2 1187.3,1630.6 BAT1.1@1187.3,1634.3 ; D4.1@1176.354,1621.846 cw(c1177.207,1620.993) 1177.207,1622.2 cw(c1177.207,1623.407) D4.1@1176.354,1622.554 ; BAT1.1@1186.239,1633.239 cw(c1183.679,1630.679) 1187.3,1630.679 cw(c1190.921,1630.679) BAT1.1@1188.361,1633.239 ; BAT1.1@1186.593,1633.593 cw(c1184.886,1631.886) 1187.3,1631.886 cw(c1189.714,1631.886) BAT1.1@1188.007,1633.593
NetC401_1: C401.1 U40.3 | length 6.2
  TopLayer w0.2: U40.3@1165.388,1672.481 1165.388,1674.2 C401.1@1166.669,1675.48 ; 1165.388,1674.024 ccw(c1166.224,1674.024) U40.3@1165.633,1673.433 ; 1165.901,1674.712 ccw(c1165.133,1675.48) C401.1@1166.219,1675.48 ; 1166.022,1674.833 cw(c1166.619,1674.235) C401.1@1166.619,1675.08 ; C401.1@1166.242,1675.054 ccw(c1165.816,1675.48) C401.1@1166.419,1675.48
NetC402_2: C402.2 U40.5 | length 5.6
  TopLayer w0.2: C402.2@1162.586,1675.198 cw(c1161.954,1674.565) 1162.848,1674.565 ; U40.5@1162.848,1672.481 1162.848,1675.41 C402.2@1162.919,1675.48 ; 1162.848,1674.024 ccw(c1163.684,1674.024) U40.5@1163.093,1673.433 ; 1162.848,1674.464 cw(c1163.885,1674.464) C402.2@1163.152,1675.198 ; 1162.848,1674.947 cw(c1163.402,1674.947) C402.2@1163.011,1675.339
NetC411_1: C411.1 U41.3 | length 6.1
  TopLayer w0.2: U41.3@1180.915,1673.356 ccw(c1180.566,1673.706) 1181.06,1673.706 ccw(c1181.554,1673.706) U41.3@1181.205,1673.356 ; U41.3@1181.06,1672.7 1181.06,1674.26 C411.1@1182.2,1675.4 ; 1181.361,1674.561 ccw(c1180.422,1675.5) C411.1@1181.75,1675.5 ; 1181.703,1674.903 ccw(c1181.105,1675.5) C411.1@1181.95,1675.5 ; 1181.723,1674.923 cw(c1182.15,1674.496) C411.1@1182.15,1675.1
NetC412_2: C412.2 U41.5 | length 5.6
  TopLayer w0.2: C412.2@1178.217,1675.217 cw(c1177.486,1674.486) 1178.52,1674.486 ; C412.2@1178.35,1675.5 1178.52,1675.33 U41.5@1178.52,1672.7 ; C412.2@1178.359,1675.359 cw(c1177.969,1674.969) 1178.52,1674.969 ; U41.5@1178.375,1673.356 ccw(c1178.026,1673.706) 1178.52,1673.706 ccw(c1179.014,1673.706) U41.5@1178.665,1673.356 ; 1178.52,1674.583 cw(c1179.417,1674.583) C412.2@1178.783,1675.217
NetC503_1: C503.1 UT5.6 | length 7.4
  TopLayer w0.2: C503.1@1107.328,1667.424 1107.758,1667.424 1108.858,1668.524 UT5.6@1110.928,1668.524 ; C503.1@1107.378,1667.424 ccw(c1107.378,1668.342) 1108.027,1667.693 ; C503.1@1107.378,1667.624 ccw(c1107.378,1669.025) 1108.368,1668.034 ; C503.1@1107.378,1667.824 ccw(c1107.378,1669.708) 1108.71,1668.376
NetC504_1: C504.1 UT5.5 | length 6.5
  TopLayer w0.2: C504.1@1107.379,1668.778 cw(c1107.972,1668.185) 1107.972,1669.024 ; C504.1@1107.52,1668.637 cw(c1108.454,1667.703) 1108.454,1669.024 ; C504.1@1107.576,1669.02 1107.58,1669.024 UT5.5@1110.928,1669.024 ; C504.1@1107.661,1668.496 cw(c1108.937,1667.22) 1108.937,1669.024
NetC505_1: C505.1 UT5.3 | length 5.2
  TopLayer w0.2: C505.1@1107.329,1671.778 1108.068,1671.778 ; C505.1@1107.726,1671.58 cw(c1108.068,1671.384) 1108.068,1671.778 ; C505.1@1107.726,1671.977 ccw(c1108.068,1672.172) 1108.068,1671.778 ; UT5.3@1110.928,1670.024 1109.822,1670.024 1108.068,1671.778
NetC513_1: C513.1 L506.1 L507.1 UT5.21 UT5.26 | length 20.5
  TopLayer w0.25: UT5.21@1115.878,1669.524 1116.52,1669.524
  TopLayer w0.3: UT5.26@1114.653,1671.749 1114.653,1672.49 1115.17,1672.855
  TopLayer w0.4: 1116.628,1669.424 1117.4,1668.9
  TopLayer w0.5: 1115.17,1672.855 1116.872,1672.855 v2(1117.405,1672.322) ; 1117.4,1668.9 C513.1@1119.2,1668.5 ; 1118.585,1668.637 ccw(c1118.746,1669.36) C513.1@1119.144,1668.735 ; 1118.775,1668.594 cw(c1118.674,1668.14) C513.1@1119.067,1668.39 ; L507.1@1119.151,1665.653 ccw(c1118.724,1666.08) 1119.328,1666.08 ccw(c1119.931,1666.08) L507.1@1119.505,1665.653 ; L506.1@1119.151,1666.799 cw(c1118.724,1666.372) 1119.328,1666.372 cw(c1119.931,1666.372) L506.1@1119.505,1666.799 ; L506.1@1119.151,1667.153 ccw(c1118.724,1667.58) 1119.328,1667.58 ccw(c1119.931,1667.58) L506.1@1119.505,1667.153 ; L507.1@1119.328,1665.524 v1(1119.328,1667.824) ; v1@1119.328,1667.92 cw(c1119.931,1667.92) 1119.505,1668.347 ccw(c1119.931,1667.92) v1@1119.328,1667.92 ; v1@1119.328,1667.92 ccw(c1118.724,1667.92) 1119.151,1668.347 cw(c1118.724,1667.92) v1@1119.328,1667.92
  BottomLayer w0.5: v2(1117.405,1672.322) 1119.328,1670.324 v1(1119.328,1667.824)
NetC526_1: C526.1 UT5.2 | length 6.8
  TopLayer w0.2: C526.1@1107.328,1673.224 1107.461,1673.224 1110.161,1670.524 UT5.2@1110.928,1670.524 ; C526.1@1107.378,1672.824 cw(c1107.378,1671.658) 1108.202,1672.483 ; C526.1@1107.378,1673.024 cw(c1107.378,1672.341) C526.1@1107.861,1672.824 ; C526.1@1107.778,1673.224 ccw(c1108.544,1673.224) 1108.002,1672.683
NetCT62_1: CT62.1 UT6.3 | length 7.1
  TopLayer w0.5: CT62.1@1063.506,1659.808 1063.61,1659.912 UT6.3@1068.095,1659.912 ; CT62.1@1063.958,1659.357 cw(c1065.299,1658.016) 1065.299,1659.912 ; CT62.1@1063.958,1660.26 ccw(c1064.799,1661.101) 1064.799,1659.912
NetCT62_2: CT61.2 CT62.2 RT62.1 | length 16.8
  TopLayer w0.2: CT62.2@1060.006,1660.479 CT62.2@1060.139,1660.611
  TopLayer w0.5: RT62.1@1057.31,1660.611 CT62.2@1060.139,1660.611 ; RT62.1@1057.445,1660.611 cw(c1057.445,1657.628) CT62.2@1059.554,1659.738 ; RT62.1@1057.537,1660.435 cw(c1057.964,1660.008) 1057.964,1660.611 cw(c1057.964,1661.215) RT62.1@1057.537,1660.788 ; 1058.652,1660.611 cw(c1058.652,1658.835) CT62.2@1059.908,1660.091 ; CT61.2@1059.554,1656.741 ccw(c1058.463,1657.832) 1060.006,1657.832 ccw(c1061.549,1657.832) CT61.2@1060.458,1656.741 ; CT62.2@1059.554,1658.976 cw(c1058.463,1657.885) 1060.006,1657.885 cw(c1061.549,1657.885) CT62.2@1060.458,1658.976 ; CT61.2@1060.006,1656.208 CT62.2@1060.006,1660.479
NetCT63_2: CT63.2 RT64.2 RT65.1 | length 12.9
  TopLayer w0.2: CT63.2@1070.272,1655.223 cw(c1070.955,1654.54) 1070.955,1655.506 cw(c1070.955,1656.471) CT63.2@1070.272,1655.789 ; CT63.2@1070.379,1655.506 ccw(c1070.379,1657.071) RT64.2@1071.559,1656.043 ; 1070.819,1655.506 ccw(c1070.819,1656.688) RT64.2@1071.71,1655.911 ; RT64.2@1071.258,1655.506 ccw(c1071.258,1656.305) RT64.2@1071.861,1655.78 ; RT64.2@1071.408,1656.174 cw(c1069.94,1657.454) CT63.2@1069.94,1655.506 RT64.2@1071.654,1655.506 ; RT65.1@1071.522,1654.795 ccw(c1071.037,1655.37) 1071.79,1655.37 ; RT64.2@1071.527,1655.629 cw(c1070.893,1654.994) 1071.79,1654.994 ; RT64.2@1071.674,1655.535 cw(c1071.614,1655.37) 1071.79,1655.37 ; RT65.1@1071.79,1654.089 1071.79,1655.37 ; RT65.1@1071.79,1654.897 cw(c1072.824,1654.897) RT64.2@1072.093,1655.629 ; 1071.79,1655.38 cw(c1072.341,1655.38) RT64.2@1071.951,1655.77 ; RT64.2@1071.91,1655.524 ccw(c1071.949,1655.37) 1071.79,1655.37 ; RT65.1@1072.049,1654.785 cw(c1072.581,1655.37) 1071.79,1655.37
NetCU10_2: CU10.2 UU1.2 X2.2 | length 21.6
  TopLayer w0.2: UU1.2@1067.315,1676 1067.315,1674.93 1067.948,1674.297 1069.838,1674.297 1070.885,1673.25 1071.85,1673.25 1072.7,1674.1 ; X2.2@1072.388,1674.62 cw(c1072.111,1674.1) 1072.7,1674.1 ; X2.2@1072.482,1674.796 cw(c1072.289,1674.434) 1072.7,1674.434 cw(c1073.111,1674.434) X2.2@1072.918,1674.796 ; X2.2@1073.012,1674.62 ccw(c1073.289,1674.1) 1072.7,1674.1 ; X2.2@1073.027,1674.877 cw(c1073.815,1674.088) 1073.815,1675.204 cw(c1073.815,1676.319) X2.2@1073.027,1675.53 ; X2.2@1073.168,1674.736 cw(c1074.298,1673.606) 1074.298,1675.204 cw(c1074.298,1676.802) X2.2@1073.168,1675.672 ; 1074.64,1675.204 ccw(c1074.64,1677.01) CU10.2@1075.917,1675.733 ; 1075.123,1675.204 ccw(c1075.123,1676.527) CU10.2@1076.059,1675.591 ; 1075.606,1675.204 ccw(c1075.606,1676.044) CU10.2@1076.2,1675.45 ; CU10.2@1076.1,1675.1 1075.996,1675.204 X2.2@1072.7,1675.204 1072.7,1674.1
NetCU11_2: CU11.2 UU1.3 X2.1 | length 24.2
  TopLayer w0.2: UU1.3@1066.68,1676 1066.68,1674.75 1067.633,1673.797 1069.698,1673.797 1070.695,1672.8 1071.9,1672.8 1072.7,1672 X2.1@1072.7,1670.4 ; X2.1@1072.232,1670.668 ccw(c1071.102,1671.798) 1072.7,1671.798 ccw(c1074.298,1671.798) 1073.168,1670.668 ccw(c1074.298,1671.798) 1074.298,1670.2 ccw(c1074.298,1668.602) X2.1@1073.168,1669.732 ; X2.1@1072.373,1670.527 ccw(c1071.585,1671.315) 1072.7,1671.315 ccw(c1073.815,1671.315) 1073.027,1670.527 ccw(c1073.815,1671.315) 1073.815,1670.2 ccw(c1073.815,1669.085) X2.1@1073.027,1669.873 ; X2.1@1072.7,1670.2 CU11.2@1076,1670.2 ; 1074.798,1670.2 cw(c1074.798,1668.615) CU11.2@1075.919,1669.736 ; 1075.281,1670.2 cw(c1075.281,1669.098) CU11.2@1076.06,1669.877 ; 1075.674,1670.2 ccw(c1075.674,1670.546) CU11.2@1075.919,1670.301
NetD2_2: D2.2 RH16.1 | length 10
  TopLayer w0.2: RH16.1@1067.633,1649.417 cw(c1068.316,1648.734) 1068.316,1649.7 cw(c1068.316,1650.666) RH16.1@1067.633,1649.983 ; RH16.1@1067.729,1649.7 ccw(c1067.729,1651.626) D2.2@1069.205,1650.389 ; 1068.157,1649.7 ccw(c1068.157,1651.267) D2.2@1069.358,1650.261 ; 1068.586,1649.7 ccw(c1068.586,1650.908) D2.2@1069.512,1650.132 ; D2.2@1069.052,1650.518 cw(c1067.3,1651.985) RH16.1@1067.3,1649.7 D2.2@1069.7,1649.7
NetD4_2: D3.2 D4.2 R71.1 | length 10.2
  TopLayer w0.5: R71.1@1170.6,1624.5 1170.7,1624.6 D3.2@1172.4,1624.6 ; R71.1@1170.777,1624.373 cw(c1171.324,1623.826) 1171.324,1624.6 ; 1171.172,1624.6 ccw(c1171.172,1625.978) D3.2@1172.146,1625.004 ; 1171.414,1624.6 cw(c1171.414,1623.564) 1172.146,1624.296 cw(c1171.293,1623.443) 1172.5,1623.443 ; D4.2@1172.146,1622.804 ccw(c1171.293,1623.657) 1172.5,1623.657 ccw(c1173.707,1623.657) D4.2@1172.854,1622.804 ; D4.2@1172.5,1622.8 D3.2@1172.5,1624.9 ; 1172.5,1623.443 cw(c1173.707,1623.443) D3.2@1172.854,1624.296
NetDC_IN_1: DC_IN.1 FUSE.1
NetFUSE2_1: FUSE2.1 USB1_2.1 USB1_2.5 | length 10.9
  TopLayer w1: FUSE2.1@1049.6,1682.4 v1(1051.3,1682.4) ; FUSE2.1@1049.685,1682.015 cw(c1050.615,1681.085) 1050.615,1682.4
  BottomLayer w1: v1@1051.3,1682.5 1054,1685.2 USB1_2.1@1054,1689.5
NetFUSE3_1: FUSE3.1 USB3_4.1 USB3_4.5 | length 8.4
  TopLayer w1: USB3_4.1@1074.766,1689.576 1074.766,1685.477 FUSE3.1@1077.798,1682.445
NetFUSE_2: C101.1 C102.1 D101.2 FUSE.2 S1.1 | length 13.9
  TopLayer w2: 1207.073,1669.927 C101.1@1207.073,1675.185 ; 1207.169,1669.927 1211.3,1665.796 ; 1211.204,1665.796 S1.1@1214.008,1665.796
NetIrDA1_1: IrDA1.1 RA2.1 | length 6.2
  TopLayer w0.2: RA2.1@1063.467,1591.217 cw(c1062.664,1590.414) 1063.8,1590.414 ; IrDA1.1@1063.512,1589.442 ccw(c1062.815,1590.139) 1063.8,1590.139 ccw(c1064.785,1590.139) IrDA1.1@1064.089,1589.442 ; RA2.1@1063.609,1591.359 cw(c1063.146,1590.896) 1063.8,1590.896 ; RA2.1@1063.7,1591.5 1063.8,1591.4 IrDA1.1@1063.8,1588.9 ; 1063.8,1590.655 cw(c1064.595,1590.655) RA2.1@1064.033,1591.217
NetJ3_2: BUZZER.1 J3.2 | length 21.7
  TopLayer w0.5: BUZZER.1@1085.2,1588.4 1090.7,1582.9 1090.7,1574.7 J3.2@1092.2,1573.2 ; BUZZER.1@1085.454,1587.888 cw(c1085.454,1587.265) BUZZER.1@1085.894,1587.706 ; BUZZER.1@1085.966,1588.4 ccw(c1087.815,1588.4) 1086.508,1587.092 ; 1091.09,1574.31 ccw(c1092.2,1575.419) J3.2@1092.2,1573.85 ; 1091.573,1573.827 cw(c1091.146,1573.4) J3.2@1091.75,1573.4
NetL503_1: C506.2 L503.1 UT5.32 | length 14
  TopLayer w0.2: L503.1@1112,1678.45 ccw(c1112,1679.295) 1112.597,1678.697 ; L503.1@1112.1,1678.2 C506.2@1113.5,1679.6 ; L503.1@1112.2,1678.05 cw(c1112.804,1678.05) L503.1@1112.377,1678.477 ; L503.1@1112.4,1678.05 cw(c1113.486,1678.05) 1112.718,1678.818 ; 1112.746,1678.846 ccw(c1111.893,1679.7) C506.2@1113.1,1679.7 ; 1112.988,1679.088 cw(c1113.5,1678.576) C506.2@1113.5,1679.3 ; 1113.088,1679.188 ccw(c1112.576,1679.7) C506.2@1113.3,1679.7
  TopLayer w0.5: v2(1110.8,1672.3) 1111.2,1672.3 1111.5,1672 ; L503.1@1111.823,1677.773 cw(c1111.396,1677.346) 1112,1677.346 cw(c1112.604,1677.346) L503.1@1112.177,1677.773 ; v1(1112,1675.6) L503.1@1112,1678
  BottomLayer w0.5: v2(1110.8,1672.3) 1110.8,1674.4 v1(1112,1675.6)
NetLED1_2: LED1.2 R9.2 | length 5.5
  TopLayer w0.2: LED1.2@1187.991,1573.041 1188.741,1573.791 ; LED1.2@1188.076,1573.431 ccw(c1188.186,1573.853) LED1.2@1188.494,1573.544 ; LED1.2@1188.126,1573.624 ccw(c1188.288,1574.245) 1188.741,1573.791 ; R9.2@1188.459,1574.659 cw(c1187.776,1573.976) 1188.741,1573.976 cw(c1189.707,1573.976) R9.2@1189.024,1574.659 ; LED1.2@1188.523,1573.167 cw(c1189.28,1573.252) 1188.741,1573.791 ; R9.2@1188.741,1574.941 1188.741,1573.791
NetLED2_2: LED2.2 R10.2 | length 5.9
  TopLayer w0.2: LED2.2@1193.3,1572.95 1194.25,1573.9 ; LED2.2@1193.386,1573.489 ccw(c1193.552,1574.108) 1194.005,1573.655 ; LED2.2@1193.438,1573.682 ccw(c1193.655,1574.495) 1194.25,1573.9 ; LED2.2@1193.835,1573.165 cw(c1194.608,1573.165) 1194.061,1573.711 ; R10.2@1193.97,1574.564 cw(c1193.322,1573.9) 1194.25,1573.9 ; R10.2@1194.25,1574.85 1194.25,1573.9 ; R10.2@1194.53,1574.564 ccw(c1195.178,1573.9) 1194.25,1573.9
NetPOWER_1: POWER.1 R331.2 | length 7.1
  TopLayer w0.2: R331.2@1205.248,1658.505 1207.492,1658.505 POWER.1@1207.498,1658.5 ; R331.2@1205.581,1658.222 cw(c1206.264,1657.54) 1206.264,1658.505 cw(c1206.264,1659.471) R331.2@1205.581,1658.788 ; 1206.127,1658.505 cw(c1206.127,1657.194) POWER.1@1207.055,1658.121 ; 1206.156,1658.505 ccw(c1206.156,1659.777) POWER.1@1207.055,1658.878 ; 1206.61,1658.505 cw(c1206.61,1657.677) POWER.1@1207.196,1658.263 ; 1206.638,1658.505 ccw(c1206.638,1659.294) POWER.1@1207.196,1658.736
NetPR_2: PR.2 RA1.2 | length 7.8
  TopLayer w0.4: PR.2@1058.4,1589.1 1060.3,1589.1 1061.35,1588.05 RA1.2@1061.35,1587 ; PR.2@1058.824,1588.676 cw(c1059.849,1587.651) 1059.849,1589.1 cw(c1059.849,1590.549) PR.2@1058.824,1589.524 ; RA1.2@1061.138,1587.212 ccw(c1060.626,1587.724) 1061.35,1587.724 ccw(c1062.074,1587.724) RA1.2@1061.562,1587.212
NetQ1_B: Q1.B R17.2 | length 5.1
  TopLayer w0.2: R17.2@1188.459,1580.059 cw(c1187.739,1579.339) 1188.757,1579.339 ; Q1.B@1188.468,1579.116 ccw(c1187.772,1579.812) 1188.757,1579.812 ccw(c1189.742,1579.812) Q1.B@1189.045,1579.116 ; R17.2@1188.6,1580.2 cw(c1188.222,1579.822) 1188.757,1579.822 ; R17.2@1188.741,1580.341 1188.757,1580.326 Q1.B@1188.757,1578.7 ; 1188.757,1579.412 cw(c1189.67,1579.412) R17.2@1189.024,1580.059
NetQ1_C: Q1.C R9.1 | length 5.1
  TopLayer w0.2: R9.1@1186.751,1575.261 ccw(c1186.391,1575.741) 1186.991,1575.741 ; 1186.928,1575.678 cw(c1187.724,1574.881) Q1.C@1187.774,1576.007 ; R9.1@1186.991,1574.941 1186.991,1575.741 ; 1187.185,1575.935 ccw(c1186.705,1576.414) Q1.C@1187.383,1576.414 ; R9.1@1187.231,1575.261 cw(c1187.591,1575.741) 1186.991,1575.741 ; 1187.249,1575.999 cw(c1187.751,1575.497) Q1.C@1187.782,1576.207 ; Q1.C@1187.791,1576.541 1186.991,1575.741
NetQ2_C: Q2.C R10.1 | length 5.1
  TopLayer w0.2: R10.1@1192.26,1575.17 ccw(c1191.9,1575.65) 1192.5,1575.65 ; 1192.437,1575.587 cw(c1193.233,1574.79) Q2.C@1193.282,1575.915 ; R10.1@1192.5,1574.85 1192.5,1575.65 ; 1192.693,1575.843 ccw(c1192.214,1576.323) Q2.C@1192.892,1576.323 ; R10.1@1192.74,1575.17 cw(c1193.1,1575.65) 1192.5,1575.65 ; 1192.758,1575.908 cw(c1193.26,1575.406) Q2.C@1193.291,1576.115 ; Q2.C@1193.3,1576.45 1192.5,1575.65
NetQ10_B: Q10.B RF1.1 RF2.1 | length 10.4
  TopLayer w0.2: Q10.B@1087.859,1599.435 1090.835,1599.435 RF1.1@1090.9,1599.5 ; Q10.B@1088.274,1599.146 cw(c1088.971,1598.45) 1088.971,1599.435 cw(c1088.971,1600.42) Q10.B@1088.274,1599.723 ; 1088.597,1599.435 ccw(c1088.597,1600.446) RF2.1@1089.312,1599.731 ; 1088.661,1599.435 cw(c1088.661,1598.515) RF2.1@1089.312,1599.165 ; 1089.079,1599.435 ccw(c1089.079,1599.963) RF2.1@1089.453,1599.59 ; RF2.1@1089.736,1599.59 ccw(c1090.11,1599.963) 1090.11,1599.435 ; RF2.1@1089.877,1599.165 cw(c1090.528,1598.515) RF1.1@1090.528,1599.435 ; RF2.1@1089.877,1599.731 ccw(c1090.593,1600.446) RF1.1@1090.593,1599.435 ; RF2.1@1089.997,1599.435 ccw(c1089.997,1600.446) RF1.1@1090.712,1599.731 ; RF2.1@1090.061,1599.435 cw(c1090.061,1598.515) RF1.1@1090.712,1599.165 ; 1090.479,1599.435 ccw(c1090.479,1599.963) RF1.1@1090.853,1599.59
NetQ10_C: BUZZER.2 Q10.C | length 7.4
  TopLayer w0.2: Q10.C@1085.4,1600.1 Q10.C@1085.7,1600.4
  TopLayer w0.5: BUZZER.2@1085.092,1596.382 ccw(c1084.348,1597.126) 1085.4,1597.126 ; BUZZER.2@1085.4,1596 Q10.C@1085.4,1600.1 ; 1085.4,1597.386 ccw(c1086.82,1597.386) BUZZER.2@1085.816,1596.382 ; 1085.4,1599.359 cw(c1086.614,1599.359) Q10.C@1085.755,1600.218
NetQH1_B: QH1.B RH12.1 RH13.2 | length 10.3
  TopLayer w0.2: RH13.2@1063.715,1651.688 ccw(c1063.024,1652.38) 1064.002,1652.38 ; RH12.1@1063.719,1652.712 cw(c1063.036,1652.029) 1064.002,1652.029 cw(c1064.967,1652.029) RH12.1@1064.285,1652.712 ; 1064.002,1652.362 ccw(c1064.955,1652.362) RH13.2@1064.281,1651.688 ; RH13.2@1064.048,1651.405 1064.002,1651.452 RH12.1@1064.002,1652.995 1065.605,1652.995 QH1.B@1065.7,1652.9 ; RH12.1@1064.148,1652.995 ccw(c1064.148,1654.519) QH1.B@1065.226,1653.441 ; RH12.1@1064.335,1652.712 cw(c1065.017,1652.029) 1065.017,1652.995 cw(c1065.017,1653.96) RH12.1@1064.335,1653.277 ; 1064.631,1652.995 ccw(c1064.631,1654.036) QH1.B@1065.367,1653.3 ; 1064.911,1652.995 cw(c1064.911,1652.549) QH1.B@1065.226,1652.864
NetR18_2: Q2.B R18.2 | length 5.1
  TopLayer w0.2: R18.2@1193.967,1579.967 cw(c1193.248,1579.248) 1194.265,1579.248 ; Q2.B@1193.977,1579.024 ccw(c1193.28,1579.721) 1194.265,1579.721 ccw(c1195.25,1579.721) Q2.B@1194.554,1579.024 ; R18.2@1194.109,1580.109 cw(c1193.73,1579.73) 1194.265,1579.73 ; R18.2@1194.25,1580.25 1194.265,1580.235 Q2.B@1194.265,1578.609 ; 1194.265,1579.321 cw(c1195.179,1579.321) R18.2@1194.533,1579.967